# Altium PCB MCU.PcbDoc (part 1 of 3)
Units mm, origin at the board's own origin, x right, y up, seen from the top; angles counter-clockwise.
Board outline 98.27 x 98.24 mm, 2 copper layers (Top Layer, Bottom Layer); 274 components, 263 nets, 1117 pads, 8 vias.
Unrouted connection lines stored in the file: 819.
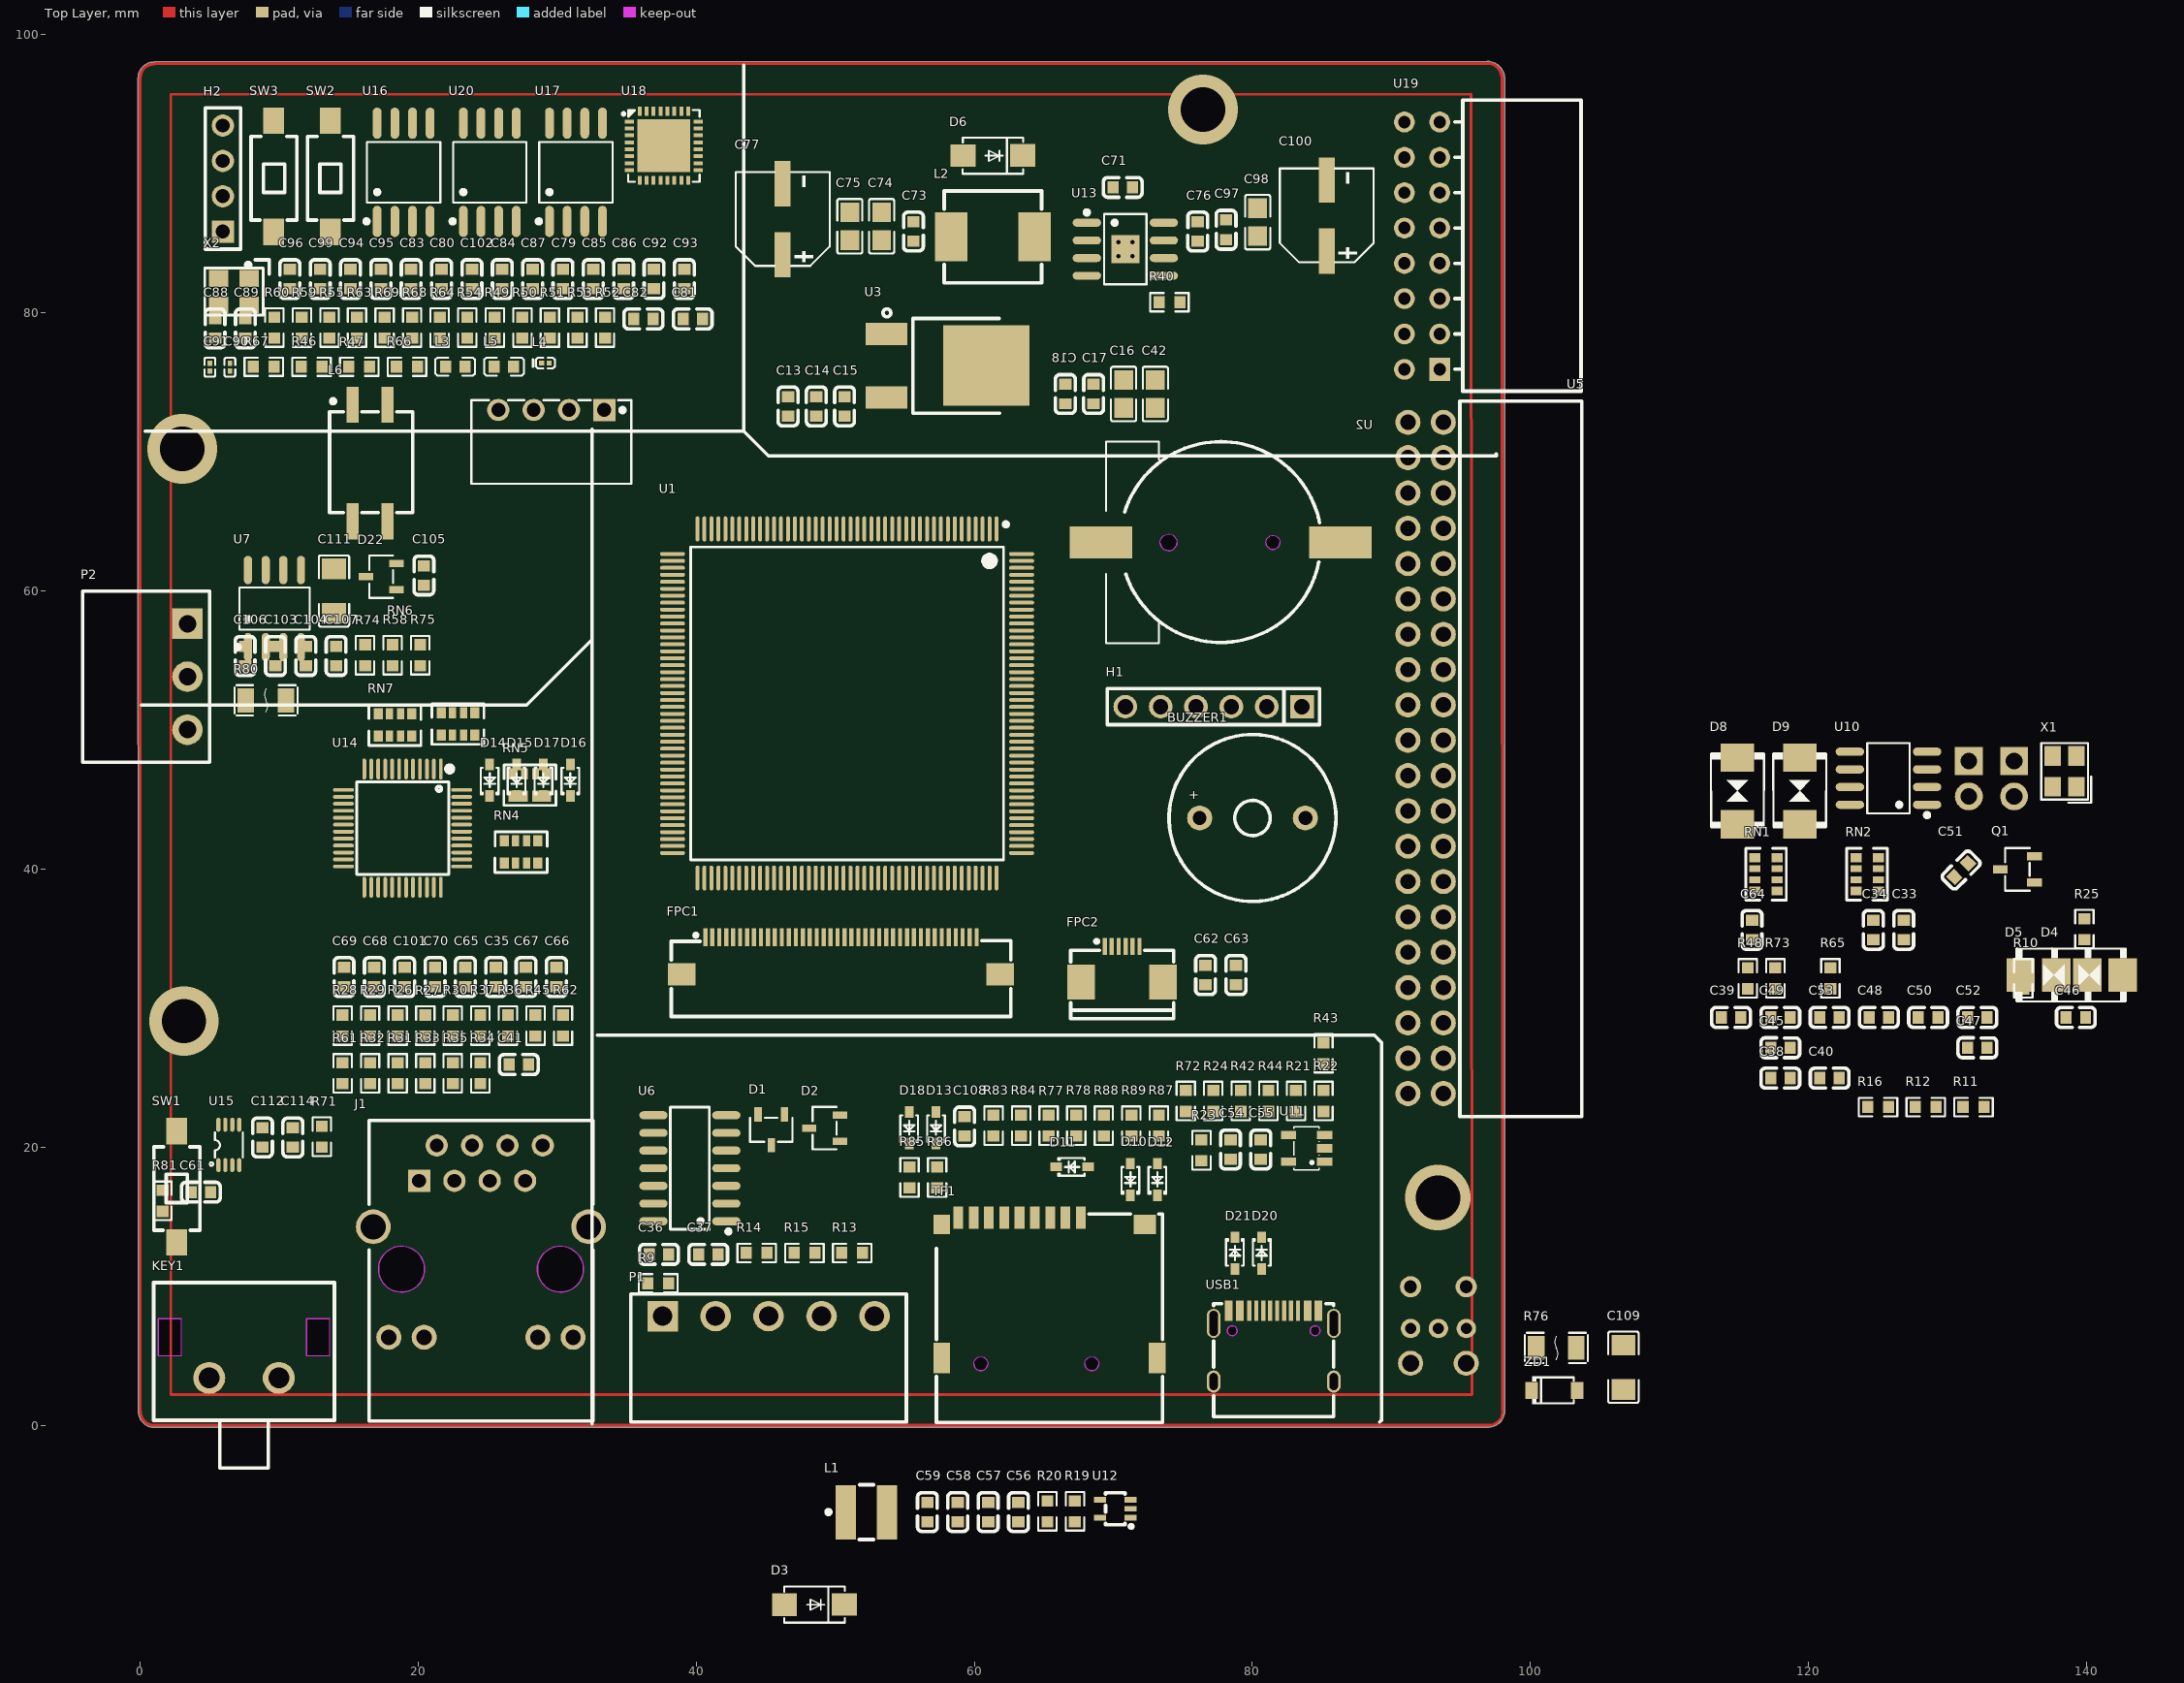
[diagram p0: Top Layer view]
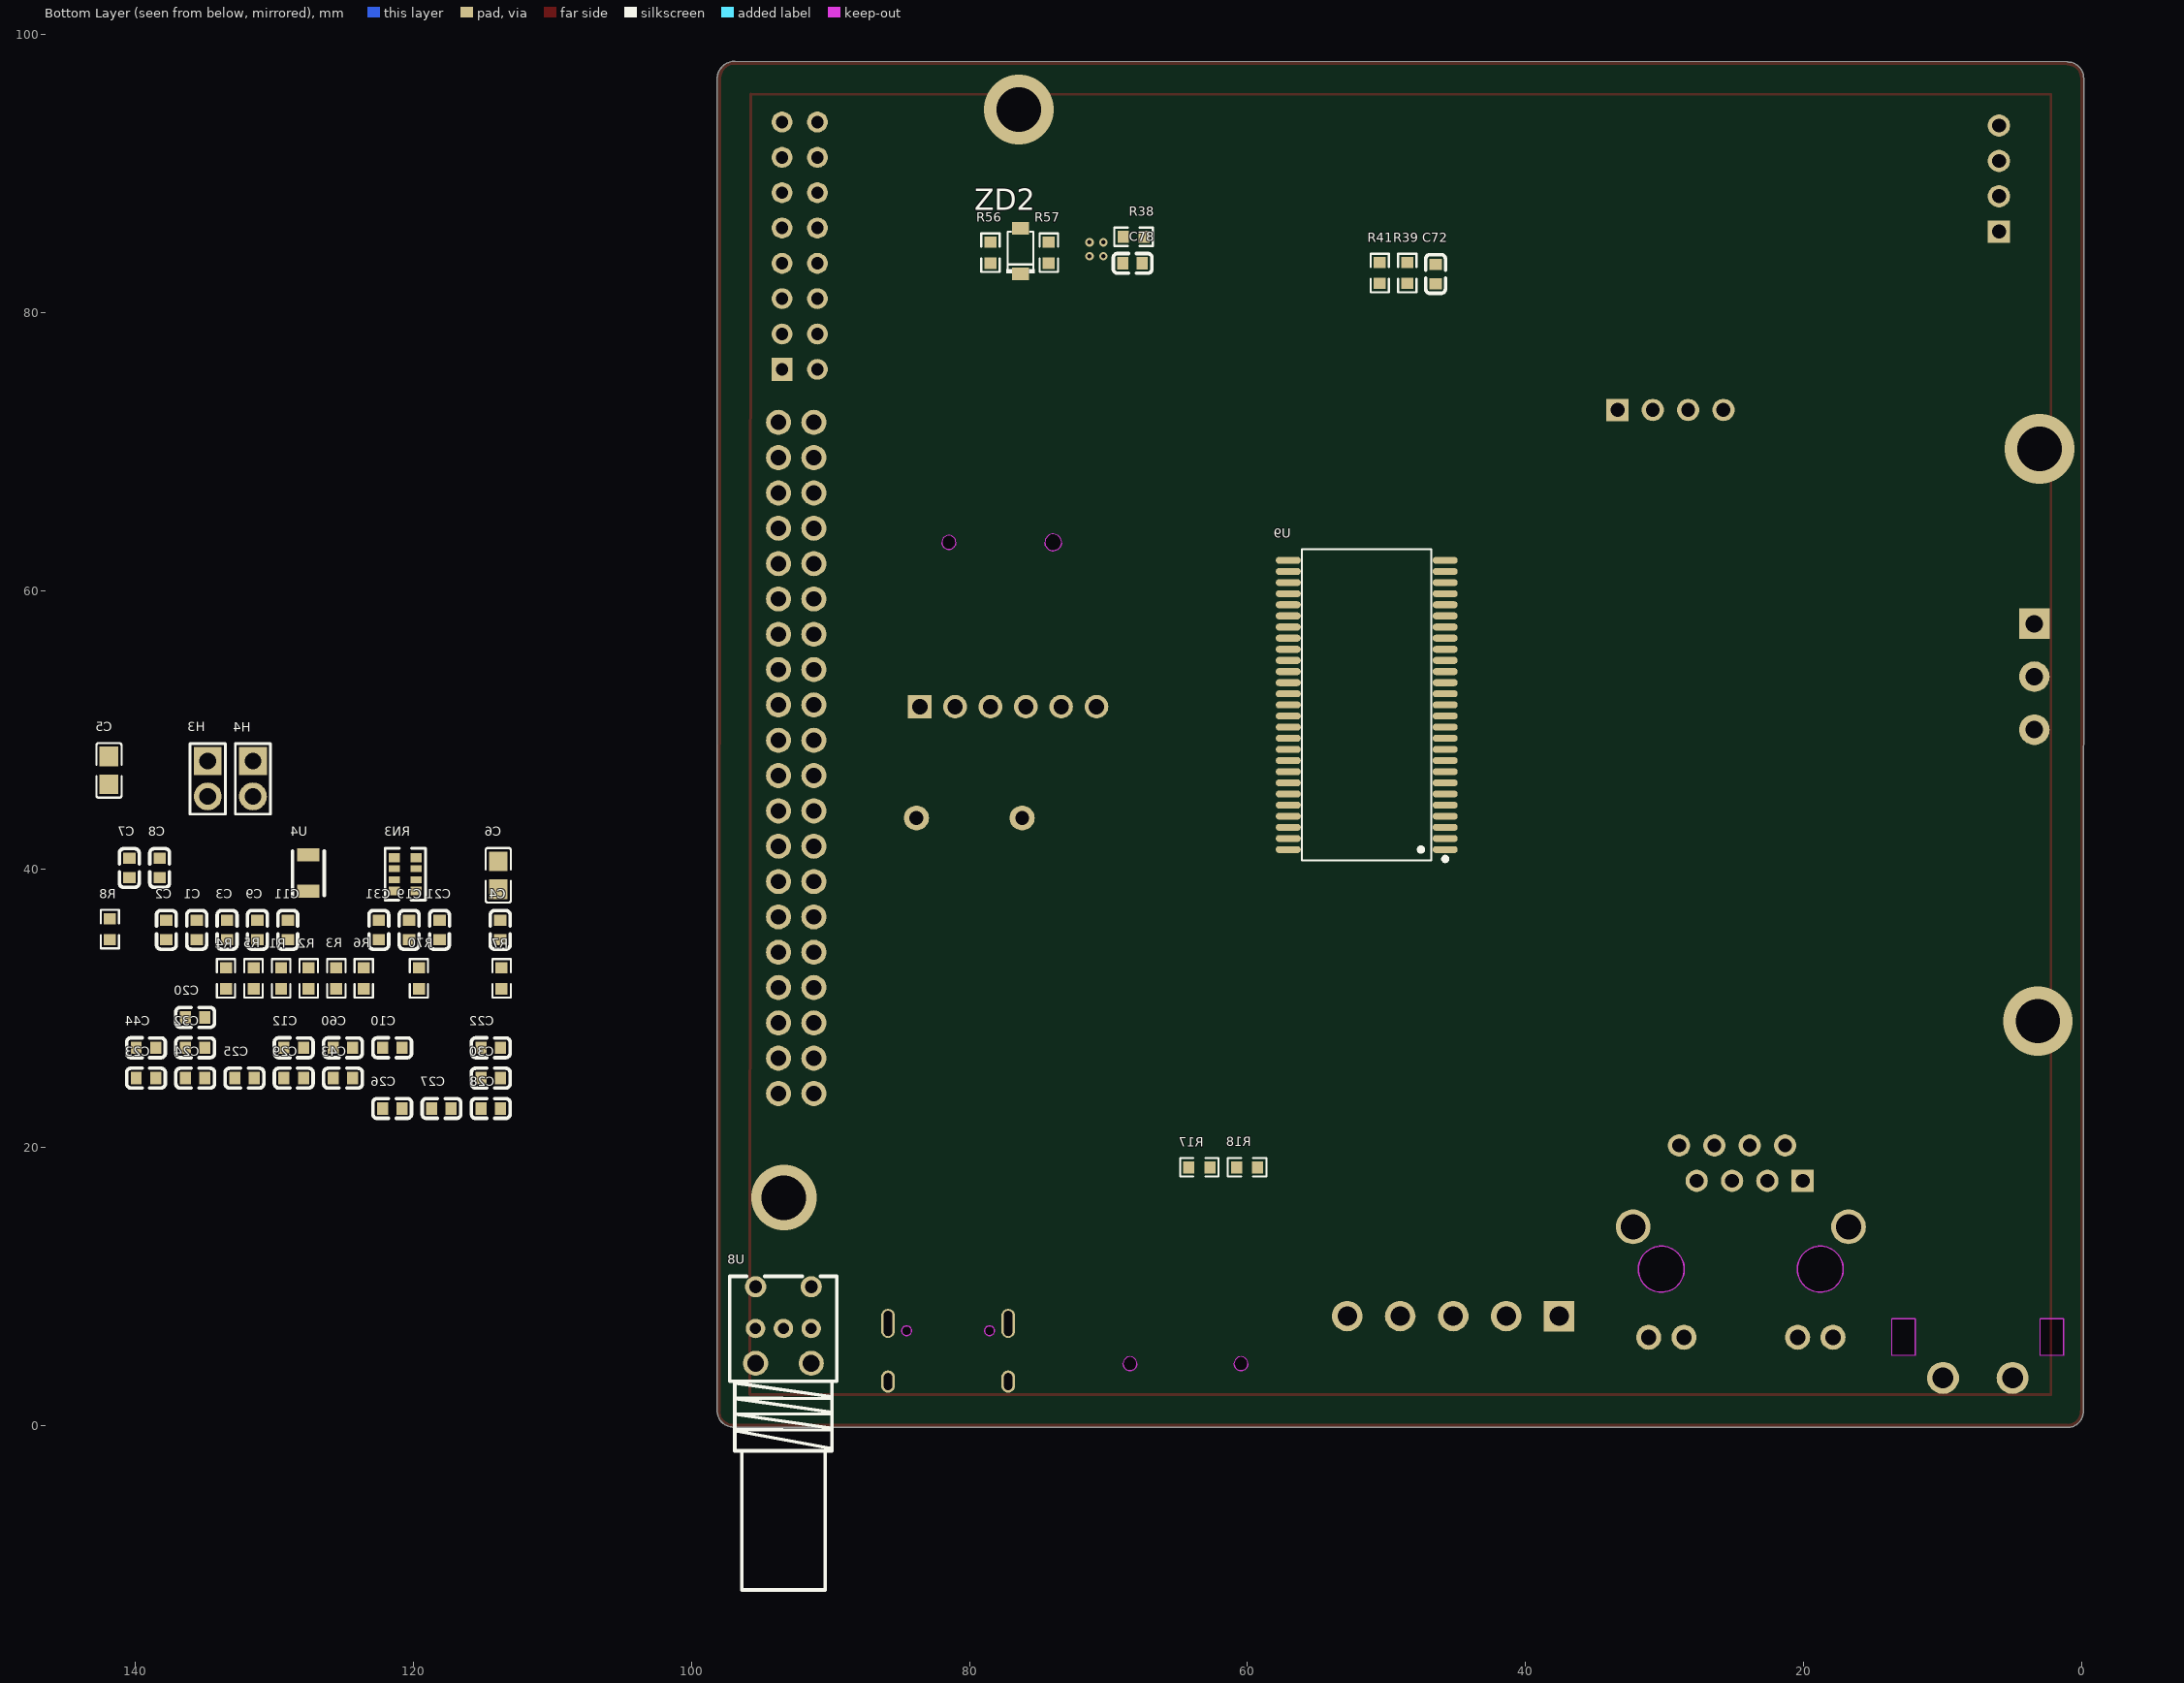
[diagram p1: Bottom Layer view, seen from below]

## Layer stack, top to bottom
Top Solder: solder mask 0.0102, Solder Resist, Dk 3.5
Top Layer: signal copper 0.0356
Dielectric 1: dielectric 0.32, FR-4, Dk 4.8
Bottom Layer: signal copper 0.0356
Bottom Solder: solder mask 0.0102, Solder Resist, Dk 3.5

## Board outline
-0.095,0.924 -0.127,96.901 -0.119,96.948 cw(c1.024,96.893) 0.954,98.035 1.037,98.066 96.858,98.1 cw(c96.858,96.816) 98.142,96.816 98.142,1.045 98.134,0.999 cw(c96.992,1.045) 97.116,-0.092 97.028,-0.127 1.088,-0.127 1.045,-0.135 cw(c1.045,1.008)

## Design rules (kind name [scope] priority, off if disabled: settings)
Clearance [All] p1: gap=0.254 ignorepadtopadclearanceinfootprint=FALSE
PolygonConnect [All] p1: connectstyle=Relief reliefconductorwidth=0.254 reliefentries=4 polygonreliefangle="90 Angle" airgapwidth=0.254
RoutingVias [All] p1: holewidth=0.711 width=1.27 viastyle="Through Hole" minholewidth=0.711 minwidth=1.27 maxholewidth=0.711 maxwidth=1.27
SolderMaskExpansion [All] p1: expansion=0.102 istentingtop=FALSE
SupplyNets "Schematic Supply Nets_6" [InNet('GND')] p1: voltage=0.000
SupplyNets "Schematic Supply Nets_3" [InNet('CAN_GND')] p2: voltage=0.000
SupplyNets "Schematic Supply Nets_1" [InNet('NetC54_1')] p3: voltage=0.000
SupplyNets "Schematic Supply Nets_10" [InNet('CAN_+5V')] p4: voltage=0.000
SupplyNets "Schematic Supply Nets_8" [InNet('+3V3')] p5: voltage=0.000
SupplyNets "Schematic Supply Nets_7" [InNet('PE')] p6: voltage=0.000
SupplyNets "Schematic Supply Nets_5" [InNet('+3V3（A）')] p7: voltage=0.000
SupplyNets "Schematic Supply Nets_4" [InNet('+12V')] p8: voltage=0.000
SupplyNets "Schematic Supply Nets_2" [InNet('+VBUS')] p9: voltage=0.000
SupplyNets "Schematic Supply Nets" [InNet('+5V')] p10: voltage=0.000
Width [All] p1: maxlimit=0.254 minlimit=0.254 preferedwidth=0.254
30 further rules are at their usual default settings.

## Classes and differential pairs
net class FMC_D[0..15]: FMC_D0 FMC_D1 FMC_D2 FMC_D3 FMC_D4 FMC_D5 FMC_D6 FMC_D7 FMC_D8 FMC_D9 FMC_D10 FMC_D11 FMC_D12 FMC_D13 FMC_D14 FMC_D15
net class FMC_A[0..11]: FMC_A0 FMC_A1 FMC_A2 FMC_A3 FMC_A4 FMC_A5 FMC_A6 FMC_A7 FMC_A8 FMC_A9 FMC_A10 FMC_A11
component class "USB,TFT LCD,touchscreen,audio amplifier": BUZZER1 C54 C55 C56 C57 C58 C59 C62 C63 C64 D3 D20 D21 FPC1 FPC2 L1 Q1 R19 R20 R21 R22 R23 R24 R25 R42 R43 R44 R72 R73 U11 U12 USB1 ZD1
component class "SDRAM，JTAG，I2C EEPROM，SD Card": C43 C44 C45 C46 C47 C48 C49 C50 C51 C52 C53 C108 D4 D5 D8 D9 D10 D11 D12 D13 D18 H1 R17 R18 R77 R78 R83 R84 R85 R86 R87 R88 R89 TF1 U9 U10
component class MCU_F7: C1 C2 C3 C4 C5 C6 C7 C8 C9 C10 C11 C12 C13 C14 C15 C16 C17 C18 C19 C20 C21 C22 C23 C24 C25 C26 C27 C28 C29 C30 C31 C32 C42 C60 C71 C72 C73 C74 C75 C76 C77 C78 C97 C98 C100 D6 H3 H4 L2 R1 R2 R3 R4 R5 R6 R7 R8 R38 R39 R40 R41 R48 R56 R57 R65 R70 RN1 RN2 RN3 U1 U2 U3 U4 U13 X1 ZD2
component class IO_Connectors: C33 C34 C36 C37 C38 C39 C40 C61 C112 C114 D1 D2 KEY1 P1 R9 R10 R11 R12 R13 R14 R15 R16 R71 R81 SW1 U5 U6 U8 U15 U19
component class "Ethernet PHY": C35 C41 C65 C66 C67 C68 C69 C70 C101 D14 D15 D16 D17 J1 R26 R27 R28 R29 R30 R31 R32 R33 R34 R35 R36 R37 R45 R61 R62 RN4 RN5 RN6 RN7 U14
component class bootload_wifi: C79 C80 C81 C82 C83 C84 C85 C86 C87 C88 C89 C90 C91 C92 C93 C94 C95 C96 C99 C102 H2 L3 L4 L5 R46 R47 R49 R50 R51 R52 R53 R54 R55 R59 R60 R63 R64 R66 R67 R68 R69 SW2 SW3 U16 U17 U18 U20 X2

## Components (designator, comment, footprint, x,y, rotation, side; value= is the part's Value field where it differs from the comment)
BUZZER1 "tmb12a05_c96093" BUZ-TH_BD12.0-P7.60-D0.6-FD 80.01,43.688 r0 top value=2.4kHz
C1 "0.1uF" C0603 135.562,35.642 r270 bottom value=104
C2 "1uF" C0603 137.744,35.642 r270 bottom value=104
C3 "0.1uF" C0603 133.379,35.642 r270 bottom value=104
C4 "0.1uF" C0603 113.74,35.642 r270 bottom value=104
C5 "2.2uF" C0805 141.874,47.109 r270 bottom value=104
C6 "2.2uF" C0805 113.883,39.569 r270 bottom value=104
C7 "0.1uF" C0603 140.408,40.092 r270 bottom value=104
C8 "1uF" C0603 138.226,40.092 r270 bottom value=104
C9 "12pF" C0603 131.197,35.642 r270 bottom value=104
C10 "12.5pF" C0603 121.504,27.167 r180 bottom value=104
C11 "12pF" C0603 129.015,35.642 r270 bottom value=104
C12 "12.5pF" C0603 128.588,27.167 r180 bottom value=104
C13 "10uF" C0603 46.609,73.279 r90 top value=104
C14 "1uF" C0603 48.641,73.279 r90 top value=104
C15 "0.1uF" C0603 50.673,73.279 r90 top value=104
C16 "47uF" C0805 70.739,74.168 r90 top value=104
C17 "1uF" C0603 68.58,74.168 r90 top value=104
C18 "0.1uF" C0603 66.548,74.168 r90 top value=104
C19 "1uF" C0603 120.286,35.641 r90 bottom value=104
C20 "0.1uF" C0603 135.672,29.349 r180 bottom value=104
C21 "0.1uF" C0603 118.104,35.642 r270 bottom value=104
C22 "0.1uF" C0603 114.42,27.167 r180 bottom value=104
C23 "0.1uF" C0603 139.214,24.985 r180 bottom value=104
C24 "0.1uF" C0603 135.672,24.985 r180 bottom value=104
C25 "0.1uF" C0603 132.13,24.985 r180 bottom value=104
C26 "1uF" C0603 121.504,22.802 r180 bottom value=104
C27 "0.1uF" C0603 117.962,22.802 r180 bottom value=104
C28 "0.1uF" C0603 114.42,22.802 r180 bottom value=104
C29 "0.1uF" C0603 128.588,24.985 r180 bottom value=104
C30 "0.1uF" C0603 114.42,24.985 r180 bottom value=104
C31 "0.1uF" C0603 122.469,35.642 r270 bottom value=104
C32 "0.1uF" C0603 135.672,27.167 r180 bottom value=104
C33 "1uF" C0603 126.833,35.641 r90 top value=104
C34 "2.2uF" C0603 124.651,35.641 r90 top value=104
C35 "0.1uF" C0603 25.591,32.251 r90 top value=104
C36 "1uF" C0603 37.331,12.311 r180 top value=104
C37 "0.1uF" C0603 40.873,12.311 r180 top value=104
C38 "10nF" C0603 117.962,24.985 r180 top value=104
C39 "10nF" C0603 114.42,29.349 r180 top value=104
C40 "10nF" C0603 121.504,24.985 r180 top value=104
C41 "0.1uF" C0603 27.25,25.959 r0 top value=104
C42 "22uF" C0805 73.025,74.168 r90 top value=104
C43 "1uF" C0603 125.046,24.985 r180 bottom value=104
C44 "0.1uF" C0603 139.214,27.167 r180 bottom value=104
C45 "1uF" C0603 117.962,27.167 r180 top value=104
C46 "0.1uF" C0603 139.214,29.349 r180 top value=104
C47 "1uF" C0603 132.13,27.167 r0 top value=104
C48 "0.1uF" C0603 125.046,29.349 r0 top value=104
C49 "0.1uF" C0603 117.962,29.349 r0 top value=104
C50 "0.1uF" C0603 128.588,29.349 r0 top value=104
C51 "0.1uF" C0603 130.967,39.944 r45 top value=104
C52 "0.1uF" C0603 132.13,29.349 r0 top value=104
C53 "0.1uF" C0603 121.504,29.349 r0 top value=104
C54 "2.2uF" C0603 78.421,19.852 r90 top value=104
C55 "0.1uF" C0603 80.604,19.852 r90 top value=104
C56 "4.7uF" C0603 63.18,-6.216 r90 top value=104
C57 "1uF" C0603 60.998,-6.216 r90 top value=104
C58 "4.7uF" C0603 58.815,-6.216 r90 top value=104
C59 "1uF" C0603 56.633,-6.216 r90 top value=104
C60 "2.2uF" C0603 125.046,27.167 r180 bottom value=104
C61 "1uF" C0603 4.388,16.783 r180 top value=104
C62 "0.1uF" C0603 76.635,32.392 r90 top value=104
C63 "1uF" C0603 78.817,32.392 r90 top value=104
C64 "0.1uF" C0603 115.922,35.641 r90 top value=104
C65 "0.1uF" C0603 23.409,32.252 r270 top value=104
C66 "10uF" C0603 29.955,32.252 r270 top value=104
C67 "0.1uF" C0603 27.773,32.252 r270 top value=104
C68 "0.1uF" C0603 16.862,32.252 r270 top value=104
C69 "0.1uF" C0603 14.68,32.252 r270 top value=104
C70 "0.1uF" C0603 21.226,32.252 r270 top value=104
C71 "0.1uF" C0603 70.674,89.027 r0 top value=104
C72 "220pF" C0603 46.482,82.804 r90 bottom value=104
C73 "0.1uF" C0603 55.626,85.852 r270 top value=104
C74 "4.7uF" C0805 53.34,86.233 r270 top value=104
C75 "22uF" C0805 51.054,86.233 r270 top value=104
C76 "0.1uF" C0603 76.073,85.852 r270 top value=104
C77 "100uf" CAP-SMD_BD6.3-L6.6-W6.6-RD 46.228,86.741 r270 top value=100uF
C78 "150pF" C0603 68.264,83.566 r180 bottom value=104
C79 "15pF" C0603 30.426,82.43 r90 top value=104
C80 "15pF" C0603 21.697,82.43 r90 top value=104
C81 "1uF" C0603 39.756,79.568 r0 top value=104
C82 "0.1uF" C0603 36.214,79.568 r180 top value=104
C83 "1uF" C0603 19.515,82.43 r90 top value=104
C84 "10uF" C0603 26.061,82.43 r90 top value=104
C85 "1uF" C0603 32.608,82.43 r90 top value=104
C86 "0.1uF" C0603 34.79,82.43 r90 top value=104
C87 "10uF" C0603 28.243,82.43 r90 top value=104
C88 "0.1uF" C0603 5.409,78.888 r90 top value=104
C89 "10uF" C0603 7.591,78.888 r90 top value=104
C90 "1pF" C0201 6.48,76.1 r90 top value=1uF
C91 "1pF" C0201 5.039,76.1 r90 top value=1uF
C92 "1uF" C0603 36.972,82.43 r90 top value=104
C93 "0.1uF" C0603 39.154,82.43 r90 top value=104
C94 "0.1uF" C0603 15.151,82.43 r90 top value=104
C95 "1uF" C0603 17.333,82.43 r90 top value=104
C96 "0.1uF" C0603 10.786,82.43 r90 top value=104
C97 "4.7uF" C0603 78.105,85.979 r270 top value=104
C98 "22uF" C0805 80.38,86.526 r270 top value=104
C99 "0.1uF" C0603 12.968,82.43 r90 top value=104
C100 "100uF" CAP-SMD_BD6.3-L6.6-W6.6-RD 85.344,86.995 r270 top
C101 "0.1uF" C0603 19.044,32.252 r270 top value=104
C102 "1uF" C0603 23.879,82.43 r90 top value=104
C103 "2.2uF" C0603 9.75,55.338 r90 top value=104
C104 "0.1uF" C0603 11.932,55.338 r90 top value=104
C105 "1uF" C0603 20.427,61.126 r90 top value=104
C106 "0.1uF" C0603 7.568,55.338 r90 top value=104
C107 "0.1uF" C0603 14.115,55.338 r90 top value=104
C108 "0.1uF" C0603 59.307,21.508 r90 top value=104
C109 "cc1206-1NF-2KV" C1206 106.68,4.191 r90 top value=1nF
C111 "cc1206-1NF-2KV" C1206 13.962,60.003 r90 top value=1nF
C112 "10nF" C0603 8.821,20.716 r90 top value=104
C114 "0.1uF" C0603 11.003,20.716 r90 top value=104
D1 "psm712-lf-t7" SOT-23-3_L3.0-W1.7-P0.95-LS2.9-BR 45.402,21.265 r90 top
D2 "psm712-lf-t7" SOT-23-3_L3.0-W1.7-P0.95-LS2.9-BR 49.234,21.385 r0 top
D3 "ss24" SMA_L4.3-W2.6-LS5.0-FD 48.509,-12.863 r0 top
D4 "SMBJ5.0CA" SMB_L4.6-W3.6-LS5.3-BI 140.184,32.404 r180 top
D5 "SMBJ5.0CA" SMB_L4.6-W3.6-LS5.3-BI 137.635,32.404 r180 top
D6 "ss34" SMA_L4.3-W2.6-LS5.0-FD 61.341,91.313 r0 top
D8 "SMBJ5.0CA" SMB_L4.6-W3.6-LS5.3-BI 114.884,45.633 r90 top
D9 "SMBJ5.0CA" SMB_L4.6-W3.6-LS5.3-BI 119.355,45.633 r90 top
D10 "esds311dyfr" SOD-323_L1.7-W1.3-LS2.6-RD-1 71.234,17.699 r90 top
D11 "esds311dyfr" SOD-323_L1.7-W1.3-LS2.6-RD-1 67.039,18.596 r0 top
D12 "esds311dyfr" SOD-323_L1.7-W1.3-LS2.6-RD-1 73.164,17.699 r90 top
D13 "esds311dyfr" SOD-323_L1.7-W1.3-LS2.6-RD-1 57.251,21.42 r90 top
D14 "esds311dyfr" SOD-323_L1.7-W1.3-LS2.6-RD-1 25.162,46.401 r90 top
D15 "esds311dyfr" SOD-323_L1.7-W1.3-LS2.6-RD-1 27.092,46.401 r90 top
D16 "esds311dyfr" SOD-323_L1.7-W1.3-LS2.6-RD-1 30.952,46.401 r90 top
D17 "esds311dyfr" SOD-323_L1.7-W1.3-LS2.6-RD-1 29.022,46.401 r90 top
D18 "esds311dyfr" SOD-323_L1.7-W1.3-LS2.6-RD-1 55.321,21.42 r90 top
D20 "esds311dyfr" SOD-323_L1.7-W1.3-LS2.6-RD-1 80.671,12.4 r270 top
D21 "esds311dyfr" SOD-323_L1.7-W1.3-LS2.6-RD-1 78.741,12.4 r270 top
D22 "psm712-lf-t7" SOT-23-3_L3.0-W1.7-P0.95-LS2.9-BR 17.36,61.041 r0 top
FPC1 "afc01-s40fca-00" FPC-SMD_AFC01-S40FCA-00 50.419,33.782 r0 top
FPC2 "fpc-05f-6ph20" FPC-SMD_6P-P0.50_XUNPU_FPC-05F-6PH20 70.631,33.165 r0 top
H1 "pz254v-11-06p" HDR-TH_6P-P2.54-V-M 77.216,51.689 r180 top
H2 "lail-pz2.54-4p-l" CONN-TH_LAIL-PZ2.54-4P-L 5.969,89.662 r90 top
H3 "pz254v-11-02p" HDR-TH_2P-P2.54-V-M 134.768,46.507 r270 bottom
H4 "pz254v-11-02p" HDR-TH_2P-P2.54-V-M 131.516,46.507 r270 bottom
J1 "hr911105a" RJ45-TH_HR911105A 24.532,13.245 r0 top
KEY1 "tl1100cf160q" KEY-TH_TL1100CF160Q 7.493,3.429 r0 top
L1 "3.3uH" IND-SMD_L3.9-W3.9-1 52.246,-6.223 r0 top
L2 "fxl0630-100-m" IND-SMD_L7.3-W6.8 61.341,85.471 r180 top value=10uH
L3 "2.2uH" L0603 22.678,76.137 r0 top value=10uH
L4 "1nL" L0201-RD 29.16,76.396 r0 top value=2nH
L5 "24nH" L0603 26.186,76.137 r0 top value=10uH
L6 "b82793s0513n201" FILTER-SMD_4P-L9.0-W6.0_B82790 16.565,69.206 r0 top
P1 "wj15edgrc-3.81-05p-14-00a" CONN-TH_5P-P3.81_WJ15EDGRC-3.81-5P 45.212,7.874 r0 top
P2 "wj500v-5.08-03p-14-00a" CONN-TH_3P-P3.81_WJ15EDGRC-3.81-3P 3.429,53.848 r270 top
Q1 "2n7002k-t1-ge3" SOT-23-3_L2.9-W1.6-P1.90-LS2.8-BR 135.01,39.996 r0 top
R1 "4.7K" R0603 129.493,32.155 r270 bottom
R2 "4.7K" R0603 127.511,32.155 r270 bottom
R3 "4.7K" R0603 125.529,32.155 r270 bottom
R4 "4.7K" R0603 133.456,32.155 r270 bottom
R5 "10K" R0603 131.474,32.155 r270 bottom
R6 "10K" R0603 123.548,32.155 r270 bottom
R7 "BLM18AG102SH1D" R0603 113.64,32.155 r270 bottom
R8 "47R" R0603 141.807,35.697 r270 bottom
R9 "1K" R0603 37.275,10.229 r0 top
R10 "4.7K" R0603 135.437,32.155 r90 top
R11 "4.7K" R0603 131.851,22.903 r0 top
R12 "10K" R0603 128.421,22.903 r180 top
R13 "4.7K" R0603 51.22,12.412 r180 top
R14 "1K" R0603 44.359,12.412 r180 top
R15 "4.7K" R0603 47.79,12.412 r180 top
R16 "10K" R0603 124.99,22.903 r180 top
R17 "10K" R0603 63.465,18.57 r180 bottom
R18 "10K" R0603 60.035,18.57 r180 bottom
R19 "10R" R0603 67.243,-6.16 r90 top
R20 "10R" R0603 65.262,-6.16 r90 top
R21 "5.1K" R0603 83.134,23.339 r90 top
R22 "5.1K" R0603 85.115,23.339 r90 top
R23 "22R" R0603 76.34,19.797 r90 top
R24 "22R" R0603 77.189,23.339 r90 top
R25 "10K" R0603 139.825,35.697 r90 top
R26 "2.2KΩ" R0603 18.543,28.765 r270 top
R27 "2.2KΩ" R0603 20.525,28.765 r270 top
R28 "2.2KΩ" R0603 14.58,28.765 r270 top
R29 "220Ω" R0603 16.561,28.765 r270 top
R30 "220Ω" R0603 22.506,28.765 r270 top
R31 "2.2KΩ" R0603 18.543,25.335 r270 top
R32 "2.2KΩ" R0603 16.561,25.335 r270 top
R33 "4K87Ω" R0603 20.525,25.335 r270 top
R34 "2.2KΩ" R0603 24.488,25.335 r270 top
R35 "BLM18AG102SH1D" R0603 22.506,25.335 r270 top
R36 "49.9Ω" R0603 26.469,28.765 r270 top
R37 "49.9Ω" R0603 24.488,28.765 r270 top
R38 "100k" R0603 68.199,85.471 r180 bottom
R39 "210k" R0603 48.512,82.868 r90 bottom
R40 "100k" R0603 74.041,80.772 r0 top
R41 "40.2k" R0603 50.494,82.868 r270 bottom
R42 "10K" R0603 79.17,23.339 r90 top
R43 "5.1K" R0603 85.115,26.769 r90 top
R44 "5.1K" R0603 81.152,23.339 r90 top
R45 "2.2KΩ" R0603 28.451,28.765 r270 top
R46 "100KΩ" R0603 12.347,76.126 r180 top
R47 "100KΩ" R0603 15.778,76.126 r180 top
R48 "4.7K" R0603 115.621,32.155 r90 top
R49 "499Ω" R0603 25.526,78.944 r90 top
R50 "100KΩ" R0603 27.508,78.944 r90 top
R51 "100KΩ" R0603 29.489,78.944 r90 top
R52 "0Ω" R0603 33.452,78.944 r90 top
R53 "0Ω" R0603 31.471,78.944 r90 top
R54 "0Ω" R0603 23.544,78.944 r90 top
R55 "0Ω" R0603 13.636,78.944 r90 top
R56 "20k" R0603 78.486,84.328 r270 bottom
R57 "10k" R0603 74.295,84.328 r270 bottom
R58 "5Ω" R0603 18.178,55.394 r90 top
R59 "100KΩ" R0603 11.655,78.944 r90 top
R60 "100KΩ" R0603 9.673,78.944 r90 top
R61 "49.9Ω" R0603 14.58,25.335 r270 top
R62 "49.9Ω" R0603 30.433,28.765 r270 top
R63 "10kΩ" R0603 15.618,78.944 r90 top
R64 "10kΩ" R0603 21.563,78.944 r90 top
R65 "4.7K" R0603 121.566,32.155 r90 top
R66 "10KΩ" R0603 19.208,76.126 r180 top
R67 "10KΩ" R0603 8.916,76.126 r180 top
R68 "10KΩ" R0603 19.581,78.944 r90 top
R69 "10KΩ" R0603 17.6,78.944 r90 top
R70 "0R" R0603 119.585,32.155 r270 bottom
R71 "1K" R0603 13.085,20.772 r90 top
R72 "10K" R0603 75.207,23.339 r90 top
R73 "100K" R0603 117.603,32.155 r90 top
R74 "5Ω" R0603 16.196,55.394 r90 top
R75 "120Ω" R0603 20.16,55.394 r90 top
R76 "1206-1M" F1206 101.854,5.588 r0 top
R77 "10K" R0603 65.352,21.564 r90 top
R78 "10K" R0603 67.334,21.564 r90 top
R80 "1206-1M" F1206 9.076,52.145 r0 top
R81 "10K" R0603 1.626,16.159 r90 top
R83 "10R" R0603 61.389,21.564 r90 top
R84 "10R" R0603 63.371,21.564 r90 top
R85 "10R" R0603 55.347,17.846 r90 top
R86 "10R" R0603 57.328,17.846 r90 top
R87 "10R" R0603 73.279,21.564 r90 top
R88 "10R" R0603 69.315,21.564 r90 top
R89 "10R" R0603 71.297,21.564 r90 top
RN1 "4d03wgj0330t5e" RES-ARRAY-SMD_0603-8P-L3.2-W1.6-BL 116.942,39.636 r90 top value=33Ω
RN2 "4d03wgj0330t5e" RES-ARRAY-SMD_0603-8P-L3.2-W1.6-BL 124.201,39.636 r90 top value=33Ω
RN3 "4d03wgj0330t5e" RES-ARRAY-SMD_0603-8P-L3.2-W1.6-BL 120.571,39.639 r270 bottom value=33Ω
RN4 "4d03wgj0330t5e" RES-ARRAY-SMD_0603-8P-L3.2-W1.6-BL 27.414,41.237 r180 top value=33Ω
RN5 "4d03wgj0330t5e" RES-ARRAY-SMD_0603-8P-L3.2-W1.6-BL 28.049,46.063 r180 top value=33Ω
RN6 "4d03wgj0330t5e" RES-ARRAY-SMD_0603-8P-L3.2-W1.6-BL 22.88,50.457 r180 top value=33Ω
RN7 "4d03wgj0330t5e" RES-ARRAY-SMD_0603-8P-L3.2-W1.6-BL 18.346,50.381 r180 top value=33Ω
SW1 "TS-1101-C-W" SW-SMD_L6.0-W3.3-LS8.0 2.648,17.181 r90 top
SW2 "TS-1101-C-W" SW-SMD_L6.0-W3.3-LS8.0 13.695,89.817 r90 top
SW3 "TS-1101-C-W" SW-SMD_L6.0-W3.3-LS8.0 9.633,89.817 r90 top
TF1 "tf-card h1.8" TF-SMD_TF-CARD-H1.8 65.405,9.906 r0 top
U1 "stm32f769iit6" LQFP-176_L24.0-W24.0-P0.50-LS26.0-BL 50.853,51.92 r180 top
U2 "kh-cr1220-2" BAT-SMD_CR1220-2 77.724,63.5 r0 top
U3 "uz1085l-33-tn3-r" TO-252-2_L6.6-W6.1-P4.58-TL 57.277,76.2 r0 top
U4 "fc31m2-32.768-ntlnndtl" CRYSTAL-SMD_L3.2-W1.5 127.527,39.724 r270 bottom value=32.768kHz
U5 "ds1024-2x20r2" HDR-TH_40P-P2.54-H-F-R2-C20-S2.54-W8.5 92.456,48.006 r270 top
U6 "74hc125d" SOIC-14_L8.7-W3.9-P1.27-LS6.0-BL 39.553,18.505 r90 top
U7 "ca-is1044s" SOIC-8_L4.9-W3.9-P1.27-LS6.0-BL 9.683,58.747 r0 top
U8 "ed08905m-fe15c7.0-c10-2053" SW-TH_CTR_ED08905M-FE15C7.0-C10-2053 93.375,7.234 r180 bottom
U9 "is42s16400j-7tli-tr" TSOP-54_L22.2-W10.2-P0.80-LS11.8-BL 51.435,51.816 r90 bottom
U10 "at24c256c-sshl-b" SOIC-8_L4.9-W3.9-P1.27-LS6.0-BL 125.74,46.547 r90 top
U11 "tps2051bdbvr" SOT-23-5_L3.0-W1.7-P0.95-LS2.8-BR 83.9,19.936 r0 top
U12 "tps61169dckr" SC-70-5_L2.1-W1.3-P0.65-LS2.1-BR 70.139,-5.977 r0 top
U13 "mp1584en-lf-z" SOIC-8_L5.0-W4.0-P1.27-LS6.0-BL-EP2.0 70.866,84.582 r270 top
U14 "dp83848cvv" LQFP-48_L7.0-W7.0-P0.50-LS9.0-BL 18.893,42.956 r180 top
U15 "74aup1g74dc" SOT765-1_L2.0-W2.3-P0.50-LS3.1-BL 6.4,20.181 r0 top
U16 "w25q32jvssiq" SOIC-8_L5.3-W5.3-P1.27-LS8.0-BL 18.97,90.112 r0 top
U17 "w25q32jvssiq" SOIC-8_L5.3-W5.3-P1.27-LS8.0-BL 31.361,90.112 r0 top
U18 "esp32-c3" QFN-32_L5.0-W5.0-P0.50-TL-EP3.7 37.684,92.016 r0 top
U19 "b254w11-0b16p51-h85c32" HDR-TH_16P-P2.54-H-F-R2-C8-W8.5 92.202,84.836 r90 top
U20 "w25q32jvssiq" SOIC-8_L5.3-W5.3-P1.27-LS8.0-BL 25.166,90.112 r0 top
USB1 "TYPEC-304-BCP16" USB-C-SMD_TYPEC-304-BCP16 81.534,5.715 r0 top
X1 "x322525mob4si" CRYSTAL-SMD_4P-L3.2-W2.5-BL 138.402,47.046 r90 top value=25MHz
X2 "x322540mpb4si" OSC-SMD_4P-L3.2-W2.5-BL_SIT8008BI 6.774,81.534 r180 top value=40MHz
ZD1 "BZD52C6.2V" SOD-123_L2.7-W1.6-LS3.7-RD 101.727,2.54 r0 top
ZD2 "BZD52C3.3V" SOD-123_L2.7-W1.6-LS3.7-RD 76.327,84.455 r90 bottom
? "b0505s" PWRM-TH_B0505S-1WR3 29.591,73.025 r180 top value=200kHz~340kHz

## Footprints (in the part's own frame and the unit in brackets; to place one, negate y for a bottom-side part, rotate by r counter-clockwise, add the part's x,y. Pads: shape width x height; smd on the part's side, far side on the other; paste and mask are expansions set on the pad)
BAT-SMD_CR1220-2 [mil]
  rect 177.2x90.6 smd: 1(-338.6,0) 2(338.5,0)
  Keep-Out Layer board cut-out: -124.1,0 -124.4,-4.2 -125.6,-8.3 -127.4,-12.1 -129.9,-15.5 -132.9,-18.4 -136.5,-20.8 -140.4,-22.4 -144.5,-23.4 -148.7,-23.6 -152.9,-23 -157,-21.7 -160.7,-19.7 -164,-17.1 -166.8,-13.9 -169,-10.2 -170.4,-6.3 -171.2,-2.1 -171.2,2.1 -170.4,6.3 -169,10.3 -166.8,13.9 -164,17.1 -160.7,19.7 -157,21.7 -152.9,23.1 -148.7,23.6 -144.5,23.4 -140.4,22.5 -136.5,20.8 -132.9,18.5 -129.9,15.6 -127.4,12.1 -125.6,8.3 -124.4,4.2 -124.1,0
  Keep-Out Layer board cut-out: 167.3,0 166.9,-3.8 165.8,-7.5 164,-10.9 161.5,-13.9 158.5,-16.3 155.1,-18.2 151.4,-19.3 147.6,-19.7 143.8,-19.3 140.1,-18.2 136.7,-16.3 133.7,-13.9 131.2,-10.9 129.4,-7.5 128.3,-3.8 127.9,0 128.3,3.9 129.4,7.6 131.2,11 133.7,13.9 136.7,16.4 140.1,18.2 143.8,19.3 147.6,19.7 151.4,19.3 155.1,18.2 158.5,16.4 161.5,13.9 164,11 165.8,7.6 166.9,3.9 167.3,0
  Keep-Out Layer region: -124.1,0 -124.4,-4.2 -125.6,-8.3 -127.4,-12.1 -129.9,-15.5 -132.9,-18.4 -136.5,-20.8 -140.4,-22.4 -144.5,-23.4 -148.7,-23.6 -152.9,-23 -157,-21.7 -160.7,-19.7 -164,-17.1 -166.8,-13.9 -169,-10.2 -170.4,-6.3 -171.2,-2.1 -171.2,2.1 -170.4,6.3 -169,10.3 -166.8,13.9 -164,17.1 -160.7,19.7 -157,21.7 -152.9,23.1 -148.7,23.6 -144.5,23.4 -140.4,22.5 -136.5,20.8 -132.9,18.5 -129.9,15.6 -127.4,12.1 -125.6,8.3 -124.4,4.2 -124.1,0
  Keep-Out Layer region: -124.1,0 -124.4,-4.2 -125.6,-8.3 -127.4,-12.1 -129.9,-15.5 -132.9,-18.4 -136.5,-20.8 -140.4,-22.4 -144.5,-23.4 -148.7,-23.6 -152.9,-23 -157,-21.7 -160.7,-19.7 -164,-17.1 -166.8,-13.9 -169,-10.2 -170.4,-6.3 -171.2,-2.1 -171.2,2.1 -170.4,6.3 -169,10.3 -166.8,13.9 -164,17.1 -160.7,19.7 -157,21.7 -152.9,23.1 -148.7,23.6 -144.5,23.4 -140.4,22.5 -136.5,20.8 -132.9,18.5 -129.9,15.6 -127.4,12.1 -125.6,8.3 -124.4,4.2 -124.1,0
  Keep-Out Layer region: 167.3,0 166.9,-3.8 165.8,-7.5 164,-10.9 161.5,-13.9 158.5,-16.3 155.1,-18.2 151.4,-19.3 147.6,-19.7 143.8,-19.3 140.1,-18.2 136.7,-16.3 133.7,-13.9 131.2,-10.9 129.4,-7.5 128.3,-3.8 127.9,0 128.3,3.9 129.4,7.6 131.2,11 133.7,13.9 136.7,16.4 140.1,18.2 143.8,19.3 147.6,19.7 151.4,19.3 155.1,18.2 158.5,16.4 161.5,13.9 164,11 165.8,7.6 166.9,3.9 167.3,0
  Keep-Out Layer region: 167.3,0 166.9,-3.8 165.8,-7.5 164,-10.9 161.5,-13.9 158.5,-16.3 155.1,-18.2 151.4,-19.3 147.6,-19.7 143.8,-19.3 140.1,-18.2 136.7,-16.3 133.7,-13.9 131.2,-10.9 129.4,-7.5 128.3,-3.8 127.9,0 128.3,3.9 129.4,7.6 131.2,11 133.7,13.9 136.7,16.4 140.1,18.2 143.8,19.3 147.6,19.7 151.4,19.3 155.1,18.2 158.5,16.4 161.5,13.9 164,11 165.8,7.6 166.9,3.9 167.3,0
  Keep-Out Layer lines w0.1: -171.2,-2.1 -170.4,-6.3 -169,-10.2 -166.8,-13.9 -164,-17.1 -160.7,-19.7 -157,-21.7 -152.9,-23 -148.7,-23.6 -144.5,-23.4 -140.4,-22.4 -136.5,-20.8 -132.9,-18.4 -129.9,-15.5 -127.4,-12.1 -125.6,-8.3 -124.4,-4.2 -124.1,0 -124.4,4.2 -125.6,8.3 -127.4,12.1 -129.9,15.6 -132.9,18.5 -136.5,20.8 -140.4,22.5 -144.5,23.4 -148.7,23.6 -152.9,23.1 -157,21.7 -160.7,19.7 -164,17.1 -166.8,13.9 -169,10.3 -170.4,6.3 -171.2,2.1 -171.2,-2.1 ; 127.9,0 128.3,-3.8 129.4,-7.5 131.2,-10.9 133.7,-13.9 136.7,-16.3 140.1,-18.2 143.8,-19.3 147.6,-19.7 151.4,-19.3 155.1,-18.2 158.5,-16.3 161.5,-13.9 164,-10.9 165.8,-7.5 166.9,-3.8 167.3,0 166.9,3.9 165.8,7.6 164,11 161.5,13.9 158.5,16.4 155.1,18.2 151.4,19.3 147.6,19.7 143.8,19.3 140.1,18.2 136.7,16.4 133.7,13.9 131.2,11 129.4,7.6 128.3,3.9 127.9,0
  silkscreen extent -325,-285 280,285
BUZ-TH_BD12.0-P7.60-D0.6-FD [mm]
  round 1.8 hole 1: 1(-3.8,0) 2(3.8,0)
  silkscreen extent -6,-6 6,6
C0201 [mm]
  rect 0.368x0.324 smd paste-100 mask+0.051: 1(-0.274,0) 2(0.274,0)
  silkscreen extent -0.69,-0.39 0.69,0.39
C0603 [mm]
  rect 0.8x0.9 smd paste+0 mask+0.102: 1(-0.7,0) 2(0.7,0)
  silkscreen extent -1.39,-0.71 1.39,0.71
C0805 [mm]
  rect 1.41x1.35 smd paste-100 mask+0.051: 1(-1,0) 2(1,0)
  silkscreen extent -1.96,-0.9 1.96,0.9
C1206 [mm]
  rect 1.485x1.728 smd paste-100 mask+0.051: 1(-1.593,0) 2(1.593,0)
  silkscreen extent -2.56,-1.09 2.56,1.09
CAP-SMD_BD6.3-L6.6-W6.6-RD [mm]
  rect 3.26x1.15 smd: 1(2.555,0) 2(-2.555,0)
  silkscreen extent -3.39,-3.38 3.36,3.38
CONN-TH_3P-P3.81_WJ15EDGRC-3.81-3P [mm]
  rect 2.2x2.2 hole 1.26: 1(-3.81,0)
  round 2.2 hole 1.26: 2(0,0) 3(3.81,0)
  silkscreen extent -6.15,-7.55 6.15,1.6
CONN-TH_5P-P3.81_WJ15EDGRC-3.81-5P [mm]
  rect 2.2x2.2 hole 1.4: 1(-7.62,0)
  round 2.2 hole 1.4: 2(-3.81,0) 3(0,0) 4(3.81,0) 5(7.62,0)
  silkscreen extent -9.91,-7.62 9.91,1.6
CONN-TH_LAIL-PZ2.54-4P-L [mm]
  rect 1.6x1.6 hole 1 paste-2539.97 mask+0.051: 1(-3.81,0)
  round 1.6 hole 1 paste-2539.97 mask+0.051: 2(-1.27,0) 3(1.27,0) 4(3.81,0)
  silkscreen extent -5.08,-1.27 5.08,1.27
CRYSTAL-SMD_4P-L3.2-W2.5-BL [mil]
  rect 55.1x47.2 smd: 1(-43.3,-33.5) 2(43.3,-33.5) 3(43.3,33.4) 4(-43.3,33.4)
  silkscreen extent -89,-75 80,66
CRYSTAL-SMD_L3.2-W1.5 [mil]
  rect 37.4x63 smd: 1(-51.5,0) 2(51.5,0)
  silkscreen extent -63,-45 63,45
F1206 [mm]
  rect 1.19x1.728 smd: 1(-1.445,0) 2(1.445,0)
  silkscreen extent -2.27,-1.09 2.27,1.09
FILTER-SMD_4P-L9.0-W6.0_B82790 [mm]
  rect 0.875x2.6 smd: 1(-1.25,4.195) 2(-1.25,-4.195) 3(1.25,-4.195) 4(1.25,4.195)
  silkscreen extent -2.92,-3.56 3.05,4.59
FPC-SMD_6P-P0.50_XUNPU_FPC-05F-6PH20 [mm]
  rect 0.3x1.25 smd paste+0 mask+0.05: 1(-1.25,1.288) 2(-0.75,1.288) 3(-0.25,1.288) 4(0.25,1.288) 5(0.75,1.288) 6(1.25,1.288)
  rect 2x2.5 smd paste+0 mask+0.05: 7(2.94,-1.288) 8(-2.94,-1.288)
  silkscreen extent -3.7,-3.91 3.7,1.78
FPC-SMD_AFC01-S40FCA-00 [mil]
  rect 11.8x51.2 smd: 1(-383.9,52.7) 2(-364.2,52.7) 3(-344.5,52.7) 4(-324.9,52.7) 5(-305.2,52.7) 6(-285.5,52.7) 7(-265.8,52.7) 8(-246.1,52.7) 9(-226.4,52.7) 10(-206.7,52.7) 11(-187.1,52.7) 12(-167.4,52.7) 13(-147.7,52.7) 14(-128,52.7) 15(-108.3,52.7) 16(-88.6,52.7) 17(-68.9,52.7) 18(-49.3,52.7) 19(-29.6,52.7) 20(-9.9,52.7) 21(9.8,52.7) 22(29.5,52.7) 23(49.2,52.7) 24(68.8,52.7) 25(88.5,52.7) 26(108.2,52.7) 27(127.9,52.7) 28(147.6,52.7) 29(167.3,52.7) 30(187,52.7) 31(206.6,52.7) 32(226.3,52.7) 33(246,52.7) 34(265.7,52.7) 35(285.4,52.7) 36(305.1,52.7) 37(324.8,52.7) 38(344.4,52.7) 39(364.1,52.7) 40(383.8,52.7)
  rect 78.7x63 smd: 41(-450.8,-52.8) 42(450.7,-52.8)
  silkscreen extent -481,-172 481,63
HDR-TH_2P-P2.54-V-M [mm]
  rect 2x2 hole 1.2 paste-2539.97: 1(-1.27,0)
  round 2 hole 1.2 paste-2539.97: 2(1.27,0)
  silkscreen extent -2.54,-1.27 2.54,1.27
HDR-TH_6P-P2.54-V-M [mm]
  rect 1.699x1.699 hole 1.1: 1(-6.35,0)
  round 1.699 hole 1.1: 2(-3.81,0) 3(-1.27,0) 4(1.27,0) 5(3.81,0) 6(6.35,0)
  silkscreen extent -7.6,-1.3 7.65,1.3
HDR-TH_16P-P2.54-H-F-R2-C8-W8.5 [mm]
  rect 1.7x1.5 hole 0.9 paste-2539.97 mask+0.05: 1(-8.89,-1.27)
  round 1.5 hole 0.9 paste-2539.97 mask+0.05: 2(-8.89,1.27) 3(-6.35,-1.27) 4(-6.35,1.27) 5(-3.81,-1.27) 6(-3.81,1.27) 7(-1.27,-1.27) 8(-1.27,1.27) 9(1.27,-1.27) 10(1.27,1.27) 11(3.81,-1.27) 12(3.81,1.27) 13(6.35,-1.27) 14(6.35,1.27) 15(8.89,-1.27) 16(8.89,1.27)
  silkscreen extent -10.46,-11.43 10.46,-2.35
HDR-TH_40P-P2.54-H-F-R2-C20-S2.54-W8.5 [mm]
  round 1.801 hole 1.1 paste-2539.97 mask+0.051: 1(-24.13,1.27) 2(-21.59,1.27) 3(-19.05,1.27) 4(-16.51,1.27) 5(-13.97,1.27) 6(-11.43,1.27) 7(-8.89,1.27) 8(-6.35,1.27) 9(-3.81,1.27) 10(-1.27,1.27) 11(1.27,1.27) 12(3.81,1.27) 13(6.35,1.27) 14(8.89,1.27) 15(11.43,1.27) 16(13.97,1.27) 17(16.51,1.27) 18(19.05,1.27) 19(21.59,1.27) 20(24.13,1.27) 21(24.13,-1.27) 22(21.59,-1.27) 23(19.05,-1.27) 24(16.51,-1.27) 25(13.97,-1.27) 26(11.43,-1.27) 27(8.89,-1.27) 28(6.35,-1.27) 29(3.81,-1.27) 30(1.27,-1.27) 31(-1.27,-1.27) 32(-3.81,-1.27) 33(-6.35,-1.27) 34(-8.89,-1.27) 35(-11.43,-1.27) 36(-13.97,-1.27) 37(-16.51,-1.27) 38(-19.05,-1.27) 39(-21.59,-1.27) 40(-24.13,-1.27)
  silkscreen extent -25.65,2.47 25.78,11.23
IND-SMD_L3.9-W3.9-1 [mm]
  rect 1.45x3.9 smd: 1(-1.475,0) 2(1.475,0)
  silkscreen extent -2.88,-1.97 0.52,1.97
IND-SMD_L7.3-W6.8 [mil]
  rect 92.5x137.8 smd: 1(-118.1,0) 2(118.1,0)
  silkscreen extent -138,-130 138,130
KEY-TH_TL1100CF160Q [mm]
  round 2.3 hole 1.5: 1(-2.5,0) 2(2.5,0)
  Keep-Out Layer board cut-out: 4.5,4.25 4.5,1.596 6.154,1.596 6.154,4.25 4.5,4.25
  Keep-Out Layer board cut-out: -6.157,4.257 -6.157,1.603 -4.503,1.603 -4.503,4.257 -6.157,4.257
  Keep-Out Layer region: 4.5,4.25 4.5,1.596 6.154,1.596 6.154,4.25 4.5,4.25
  Keep-Out Layer region: 4.5,4.25 4.5,1.596 6.154,1.596 6.154,4.25 4.5,4.25
  Keep-Out Layer region: -6.157,4.257 -6.157,1.603 -4.503,1.603 -4.503,4.257 -6.157,4.257
  Keep-Out Layer region: -6.157,4.257 -6.157,1.603 -4.503,1.603 -4.503,4.257 -6.157,4.257
  Keep-Out Layer lines w0.003: -6.157,1.603 -4.503,1.603 -4.503,4.257 -6.157,4.257 -6.157,1.603 ; 4.5,1.596 6.154,1.596 6.154,4.25 4.5,4.25 4.5,1.596
  silkscreen extent -6.5,-6.48 6.5,6.85
L0201-RD [mm]
  rect 0.368x0.324 smd paste-100 mask+0.051: 1(-0.274,0) 2(0.274,0)
  silkscreen extent -0.89,-0.39 0.69,0.39
L0603 [mm]
  rect 0.8x0.864 smd paste-100 mask+0.051: 1(-0.7,0) 2(0.7,0)
  silkscreen extent -1.42,-0.65 1.42,0.65
LQFP-48_L7.0-W7.0-P0.50-LS9.0-BL [mm]
  oval 0.27x1.5 smd paste+0 mask+0.05: 1(-2.75,-4.25) 2(-2.25,-4.25) 3(-1.75,-4.25) 4(-1.25,-4.25) 5(-0.75,-4.25) 6(-0.25,-4.25) 7(0.25,-4.25) 8(0.75,-4.25) 9(1.25,-4.25) 10(1.75,-4.25) 11(2.25,-4.25) 12(2.75,-4.25) 25(2.75,4.25) 26(2.25,4.25) 27(1.75,4.25) 28(1.25,4.25) 29(0.75,4.25) 30(0.25,4.25) 31(-0.25,4.25) 32(-0.75,4.25) 33(-1.25,4.25) 34(-1.75,4.25) 35(-2.25,4.25) 36(-2.75,4.25)
  oval 1.5x0.27 smd paste+0 mask+0.05: 13(4.25,-2.75) 14(4.25,-2.25) 15(4.25,-1.75) 16(4.25,-1.25) 17(4.25,-0.75) 18(4.25,-0.25) 19(4.25,0.25) 20(4.25,0.75) 21(4.25,1.25) 22(4.25,1.75) 23(4.25,2.25) 24(4.25,2.75) 37(-4.25,2.75) 38(-4.25,2.25) 39(-4.25,1.75) 40(-4.25,1.25) 41(-4.25,0.75) 42(-4.25,0.25) 43(-4.25,-0.25) 44(-4.25,-0.75) 45(-4.25,-1.25) 46(-4.25,-1.75) 47(-4.25,-2.25) 48(-4.25,-2.75)
  silkscreen extent -3.59,-4.46 3.3,3.34
LQFP-176_L24.0-W24.0-P0.50-LS26.0-BL [mil]
  oval 11x70.9 smd: 1(-423.2,-494.1) 2(-403.5,-494.1) 3(-383.8,-494.1) 4(-364.1,-494.1) 5(-344.5,-494.1) 6(-324.8,-494.1) 7(-305.1,-494.1) 8(-285.4,-494.1) 9(-265.7,-494.1) 10(-246,-494.1) 11(-226.4,-494.1) 12(-206.7,-494.1) 13(-187,-494.1) 14(-167.3,-494.1) 15(-147.6,-494.1) 16(-127.9,-494.1) 17(-108.2,-494.1) 18(-88.6,-494.1) 19(-68.9,-494.1) 20(-49.2,-494.1) 21(-29.5,-494.1) 22(-9.8,-494.1) 23(9.9,-494.1) 24(29.6,-494.1) 25(49.2,-494.1) 26(68.9,-494.1) 27(88.6,-494.1) 28(108.3,-494.1) 29(128,-494.1) 30(147.7,-494.1) 31(167.3,-494.1) 32(187,-494.1) 33(206.7,-494.1) 34(226.4,-494.1) 35(246.1,-494.1) 36(265.8,-494.1) 37(285.5,-494.1) 38(305.1,-494.1) 39(324.8,-494.1) 40(344.5,-494.1) 41(364.2,-494.1) 42(383.9,-494.1) 43(403.6,-494.1) 44(423.3,-494.1) 89(423.3,494.1) 90(403.6,494.1) 91(383.9,494.1) 92(364.2,494.1) 93(344.5,494.1) 94(324.8,494.1) 95(305.1,494.1) 96(285.5,494.1) 97(265.8,494.1) 98(246.1,494.1) 99(226.4,494.1) 100(206.7,494.1) 101(187,494.1) 102(167.3,494.1) 103(147.7,494.1) 104(128,494.1) 105(108.3,494.1) 106(88.6,494.1) 107(68.9,494.1) 108(49.2,494.1) 109(29.6,494.1) 110(9.9,494.1) 111(-9.8,494.1) 112(-29.5,494.1) 113(-49.2,494.1) 114(-68.9,494.1) 115(-88.6,494.1) 116(-108.2,494.1) 117(-127.9,494.1) 118(-147.6,494.1) 119(-167.3,494.1) 120(-187,494.1) 121(-206.7,494.1) 122(-226.4,494.1) 123(-246,494.1) 124(-265.7,494.1) 125(-285.4,494.1) 126(-305.1,494.1) 127(-324.8,494.1) 128(-344.5,494.1) 129(-364.1,494.1) 130(-383.8,494.1) 131(-403.5,494.1) 132(-423.2,494.1)
  oval 70.9x11 smd: 45(494.1,-423.3) 46(494.1,-403.6) 47(494.1,-383.9) 48(494.1,-364.2) 49(494.1,-344.5) 50(494.1,-324.8) 51(494.1,-305.1) 52(494.1,-285.5) 53(494.1,-265.8) 54(494.1,-246.1) 55(494.1,-226.4) 56(494.1,-206.7) 57(494.1,-187) 58(494.1,-167.3) 59(494.1,-147.7) 60(494.1,-128) 61(494.1,-108.3) 62(494.1,-88.6) 63(494.1,-68.9) 64(494.1,-49.2) 65(494.1,-29.6) 66(494.1,-9.9) 67(494.1,9.8) 68(494.1,29.5) 69(494.1,49.2) 70(494.1,68.9) 71(494.1,88.6) 72(494.1,108.2) 73(494.1,127.9) 74(494.1,147.6) 75(494.1,167.3) 76(494.1,187) 77(494.1,206.7) 78(494.1,226.4) 79(494.1,246) 80(494.1,265.7) 81(494.1,285.4) 82(494.1,305.1) 83(494.1,324.8) 84(494.1,344.5) 85(494.1,364.1) 86(494.1,383.8) 87(494.1,403.5) 88(494.1,423.2) 133(-494.1,423.2) 134(-494.1,403.5) 135(-494.1,383.8) 136(-494.1,364.1) 137(-494.1,344.5) 138(-494.1,324.8) 139(-494.1,305.1) 140(-494.1,285.4) 141(-494.1,265.7) 142(-494.1,246) 143(-494.1,226.4) 144(-494.1,206.7) 145(-494.1,187) 146(-494.1,167.3) 147(-494.1,147.6) 148(-494.1,127.9) 149(-494.1,108.2) 150(-494.1,88.6) 151(-494.1,68.9) 152(-494.1,49.2) 153(-494.1,29.5) 154(-494.1,9.8) 155(-494.1,-9.9) 156(-494.1,-29.6) 157(-494.1,-49.2) 158(-494.1,-68.9) 159(-494.1,-88.6) 160(-494.1,-108.3) 161(-494.1,-128) 162(-494.1,-147.7) 163(-494.1,-167.3) 164(-494.1,-187) 165(-494.1,-206.7) 166(-494.1,-226.4) 167(-494.1,-246.1) 168(-494.1,-265.8) 169(-494.1,-285.5) 170(-494.1,-305.1) 171(-494.1,-324.8) 172(-494.1,-344.5) 173(-494.1,-364.2) 174(-494.1,-383.9) 175(-494.1,-403.6) 176(-494.1,-423.3)
  silkscreen extent -455,-513 443,443
OSC-SMD_4P-L3.2-W2.5-BL_SIT8008BI [mm]
  rect 1.4x1.2 smd: 1(-1.1,-0.95) 2(1.1,-0.95) 3(1.1,0.95) 4(-1.1,0.95)
  silkscreen extent -2.54,-2.29 2.1,1.7
PWRM-TH_B0505S-1WR3 [mm]
  rect 1.6x1.6 hole 1: 1(-3.81,0)
  round 1.6 hole 1: 2(-1.27,0) 3(1.27,0) 4(3.81,0)
  silkscreen extent -5.75,-0.7 5.75,5.3
QFN-32_L5.0-W5.0-P0.50-TL-EP3.7 [mm]
  rect 0.65x0.28 smd paste-100 mask+0.051: 1(-2.478,1.75) 2(-2.478,1.25) 3(-2.478,0.75) 4(-2.478,0.25) 5(-2.478,-0.25) 6(-2.478,-0.75) 7(-2.478,-1.25) 8(-2.478,-1.75) 17(2.478,-1.75) 18(2.478,-1.25) 19(2.478,-0.75) 20(2.478,-0.25) 21(2.478,0.25) 22(2.478,0.75) 23(2.478,1.25) 24(2.478,1.75)
  rect 0.28x0.65 smd paste-100 mask+0.051: 9(-1.75,-2.478) 10(-1.25,-2.478) 11(-0.75,-2.478) 12(-0.25,-2.478) 13(0.25,-2.478) 14(0.75,-2.478) 15(1.25,-2.478) 16(1.75,-2.478) 25(1.75,2.478) 26(1.25,2.478) 27(0.75,2.478) 28(0.25,2.478) 29(-0.25,2.478) 30(-0.75,2.478) 31(-1.25,2.478) 32(-1.75,2.478)
  rect 3.8x3.8 smd paste-100 mask+0.051: 33(0,0)
  silkscreen extent -3,-2.58 2.58,2.58
R0603 [mm]
  rect 0.806x0.864 smd paste-100 mask+0.051: 1(-0.753,0) 2(0.753,0)
  silkscreen extent -1.39,-0.66 1.39,0.66
RES-ARRAY-SMD_0603-8P-L3.2-W1.6-BL [mil]
  rect 25.6x31.5 smd: 1(-47.2,-31.5) 4(47.3,-31.5) 5(47.3,31.5) 8(-47.2,31.5)
  rect 19.7x31.5 smd: 2(-15.7,-31.5) 3(15.8,-31.5) 6(15.8,31.5) 7(-15.7,31.5)
  silkscreen extent -74,-57 74,58
RJ45-TH_HR911105A [mm]
  rect 1.6x1.6 hole 1: 1(-4.45,4.355)
  round 1.6 hole 1: 2(-3.18,6.895) 3(-1.91,4.355) 4(-0.64,6.895) 5(0.63,4.355) 6(1.9,6.895) 7(3.17,4.355) 8(4.44,6.895)
  round 1.8 hole 1.1: 9(-6.625,-6.895) 10(-4.085,-6.895) 11(4.085,-6.895) 12(6.625,-6.895)
  round 2.5 hole 1.8: SH1(-7.745,1.055) SH2(7.745,1.055)
  Keep-Out Layer board cut-out: 7.366,-1.995 7.366,-2.158 7.303,-2.477 7.178,-2.777 6.997,-3.047 6.767,-3.277 6.497,-3.458 6.197,-3.583 5.878,-3.646 5.552,-3.646 5.233,-3.583 4.933,-3.458 4.663,-3.277 4.433,-3.047 4.252,-2.777 4.127,-2.477 4.064,-2.158 4.064,-1.995 4.064,-1.832 4.127,-1.513 4.252,-1.213 4.433,-0.943 4.663,-0.713 4.933,-0.532 5.233,-0.407 5.552,-0.344 5.878,-0.344 6.197,-0.407 6.497,-0.532 6.767,-0.713 6.997,-0.943 7.178,-1.213 7.303,-1.513 7.366,-1.832 7.366,-1.995 7.365,-1.995
  Keep-Out Layer board cut-out: -4.064,-1.995 -4.064,-2.158 -4.127,-2.477 -4.252,-2.777 -4.433,-3.047 -4.663,-3.277 -4.933,-3.458 -5.233,-3.583 -5.552,-3.646 -5.878,-3.646 -6.197,-3.583 -6.497,-3.458 -6.767,-3.277 -6.997,-3.047 -7.178,-2.777 -7.303,-2.477 -7.366,-2.158 -7.366,-1.995 -7.366,-1.832 -7.303,-1.513 -7.178,-1.213 -6.997,-0.943 -6.767,-0.713 -6.497,-0.532 -6.197,-0.407 -5.878,-0.344 -5.552,-0.344 -5.233,-0.407 -4.933,-0.532 -4.663,-0.713 -4.433,-0.943 -4.252,-1.213 -4.127,-1.513 -4.064,-1.832 -4.064,-1.995 -4.065,-1.995
  Keep-Out Layer circle w0.003: c5.715,-1.995 r1.65
  Keep-Out Layer circle w0.003: c-5.715,-1.995 r1.65
  Keep-Out Layer region: 7.365,-1.995 7.355,-2.173 7.326,-2.35 7.279,-2.522 7.213,-2.688 7.129,-2.846 7.029,-2.994 6.913,-3.13 6.783,-3.253 6.641,-3.361 6.488,-3.453 6.326,-3.528 6.156,-3.585 5.982,-3.623 5.804,-3.643 5.626,-3.643 5.448,-3.623 5.274,-3.585 5.104,-3.528 4.942,-3.453 4.789,-3.361 4.647,-3.253 4.517,-3.13 4.401,-2.994 4.301,-2.846 4.217,-2.688 4.151,-2.522 4.104,-2.35 4.075,-2.173 4.065,-1.995 4.075,-1.817 4.104,-1.64 4.151,-1.468 4.217,-1.302 4.301,-1.144 4.401,-0.997 4.517,-0.86 4.647,-0.737 4.789,-0.629 4.942,-0.537 5.104,-0.462 5.274,-0.405 5.448,-0.367 5.626,-0.347 5.804,-0.347 5.982,-0.367 6.156,-0.405 6.326,-0.462 6.488,-0.537 6.641,-0.629 6.783,-0.737 6.913,-0.86 7.029,-0.997 7.129,-1.144 7.213,-1.302 7.279,-1.468 7.326,-1.64 7.355,-1.817 7.365,-1.995
  Keep-Out Layer region: 7.366,-1.995 7.366,-2.158 7.303,-2.477 7.178,-2.777 6.997,-3.047 6.767,-3.277 6.497,-3.458 6.197,-3.583 5.878,-3.646 5.552,-3.646 5.233,-3.583 4.933,-3.458 4.663,-3.277 4.433,-3.047 4.252,-2.777 4.127,-2.477 4.064,-2.158 4.064,-1.995 4.064,-1.832 4.127,-1.513 4.252,-1.213 4.433,-0.943 4.663,-0.713 4.933,-0.532 5.233,-0.407 5.552,-0.344 5.878,-0.344 6.197,-0.407 6.497,-0.532 6.767,-0.713 6.997,-0.943 7.178,-1.213 7.303,-1.513 7.366,-1.832 7.366,-1.995 7.365,-1.995
  Keep-Out Layer region: -4.065,-1.995 -4.075,-2.173 -4.104,-2.35 -4.151,-2.522 -4.217,-2.688 -4.301,-2.846 -4.401,-2.994 -4.517,-3.13 -4.647,-3.253 -4.789,-3.361 -4.942,-3.453 -5.104,-3.528 -5.274,-3.585 -5.448,-3.623 -5.626,-3.643 -5.804,-3.643 -5.982,-3.623 -6.156,-3.585 -6.326,-3.528 -6.488,-3.453 -6.641,-3.361 -6.783,-3.253 -6.913,-3.13 -7.029,-2.994 -7.129,-2.846 -7.213,-2.688 -7.279,-2.522 -7.326,-2.35 -7.355,-2.173 -7.365,-1.995 -7.355,-1.817 -7.326,-1.64 -7.279,-1.468 -7.213,-1.302 -7.129,-1.144 -7.029,-0.997 -6.913,-0.86 -6.783,-0.737 -6.641,-0.629 -6.488,-0.537 -6.326,-0.462 -6.156,-0.405 -5.982,-0.367 -5.804,-0.347 -5.626,-0.347 -5.448,-0.367 -5.274,-0.405 -5.104,-0.462 -4.942,-0.537 -4.789,-0.629 -4.647,-0.737 -4.517,-0.86 -4.401,-0.997 -4.301,-1.144 -4.217,-1.302 -4.151,-1.468 -4.104,-1.64 -4.075,-1.817 -4.065,-1.995
  Keep-Out Layer region: -4.064,-1.995 -4.064,-2.158 -4.127,-2.477 -4.252,-2.777 -4.433,-3.047 -4.663,-3.277 -4.933,-3.458 -5.233,-3.583 -5.552,-3.646 -5.878,-3.646 -6.197,-3.583 -6.497,-3.458 -6.767,-3.277 -6.997,-3.047 -7.178,-2.777 -7.303,-2.477 -7.366,-2.158 -7.366,-1.995 -7.366,-1.832 -7.303,-1.513 -7.178,-1.213 -6.997,-0.943 -6.767,-0.713 -6.497,-0.532 -6.197,-0.407 -5.878,-0.344 -5.552,-0.344 -5.233,-0.407 -4.933,-0.532 -4.663,-0.713 -4.433,-0.943 -4.252,-1.213 -4.127,-1.513 -4.064,-1.832 -4.064,-1.995 -4.065,-1.995
  silkscreen extent -8.05,-12.92 8.05,8.68
SC-70-5_L2.1-W1.3-P0.65-LS2.1-BR [mm]
  rect 0.899x0.399 smd: 1(1.1,-0.65) 2(1.1,0) 3(1.1,0.65) 4(-1.1,0.65) 5(-1.1,-0.65)
  silkscreen extent -0.7,-1.4 1.27,1.15
SMA_L4.3-W2.6-LS5.0-FD [mm]
  rect 1.801x1.621 smd: 1(-2.151,-0.008) 2(2.149,0.01)
  silkscreen extent -2.17,-1.32 2.18,1.29
SMB_L4.6-W3.6-LS5.3-BI [mm]
  rect 2.047x2.4 smd: 1(-2.391,0) 2(2.391,0)
  silkscreen extent -2.67,-1.91 2.74,1.91
SOD-123_L2.7-W1.6-LS3.7-RD [mil] "BZT52C"
  rect 35.8x48 smd: 1(-64.4,0) 2(64.4,0)
  silkscreen extent -63,-40 54,39
SOD-323_L1.7-W1.3-LS2.6-RD-1 [mm]
  rect 0.83x0.63 smd paste+0 mask+0.05: 1(-1.14,0) 2(1.14,0)
  silkscreen extent -1.02,-0.64 0.89,0.64
SOIC-8_L4.9-W3.9-P1.27-LS6.0-BL [mm]
  oval 0.588x2.045 smd paste+0: 1(-1.905,-2.772) 2(-0.635,-2.772) 3(0.635,-2.772) 4(1.905,-2.772) 5(1.905,2.772) 6(0.635,2.772) 7(-0.635,2.772) 8(-1.905,2.772)
  silkscreen extent -2.8,-2.92 2.53,1.52
SOIC-8_L5.0-W4.0-P1.27-LS6.0-BL-EP2.0 [mm]
  oval 0.574x2.038 smd: 1(-1.905,-2.769) 2(-0.635,-2.769) 3(0.635,-2.769) 4(1.905,-2.769) 5(1.905,2.769) 6(0.635,2.769) 7(-0.635,2.769) 8(-1.905,2.769)
  rect 2x2 smd: 9(0,0)
  silkscreen extent -2.79,-2.92 2.53,1.52
SOIC-8_L5.3-W5.3-P1.27-LS8.0-BL [mm]
  oval 0.63x2.25 smd: 1(-1.905,-3.53) 2(-0.635,-3.53) 3(0.635,-3.53) 4(1.905,-3.53) 5(1.905,3.53) 6(0.635,3.53) 7(-0.635,3.53) 8(-1.905,3.53)
  silkscreen extent -2.82,-3.68 2.64,2.18
SOIC-14_L8.7-W3.9-P1.27-LS6.0-BL [mm]
  oval 0.574x2.037 smd: 1(-3.81,-2.619) 2(-2.54,-2.619) 3(-1.27,-2.619) 4(0,-2.619) 5(1.27,-2.619) 6(2.54,-2.619) 7(3.81,-2.619) 8(3.81,2.619) 9(2.54,2.619) 10(1.27,2.619) 11(0,2.619) 12(-1.27,2.619) 13(-2.54,2.619) 14(-3.81,2.619)
  silkscreen extent -4.7,-2.92 4.38,1.4
SOT765-1_L2.0-W2.3-P0.50-LS3.1-BL [mil]
  oval 11.8x39.4 smd: 1(-29.5,-57.1) 2(-9.9,-57.1) 3(9.8,-57.1) 4(29.5,-57.1) 5(29.5,57.1) 6(9.8,57.1) 7(-9.9,57.1) 8(-29.5,57.1)
  silkscreen extent -54,-59 39,35
SOT-23-3_L2.9-W1.6-P1.90-LS2.8-BR [mm] "DO4085A"
  rect 1.069x0.599 smd: 1(1.234,-0.95) 2(1.234,0.95) 3(-1.234,0)
  silkscreen extent -0.88,-1.54 0.88,1.54
SOT-23-3_L3.0-W1.7-P0.95-LS2.9-BR [mm]
  rect 1.037x0.532 smd: 1(1.101,-0.95) 2(1.101,0.95) 3(-1.101,0)
  silkscreen extent -0.86,-1.53 0.86,1.53
SOT-23-5_L3.0-W1.7-P0.95-LS2.8-BR [mm]
  rect 1.1x0.6 smd paste+0 mask+0.102: 1(1.3,-0.95) 2(1.3,0) 3(1.3,0.95) 4(-1.3,0.95) 5(-1.3,-0.95)
  silkscreen extent -0.9,-1.55 0.9,1.55
SW-SMD_L6.0-W3.3-LS8.0 [mm] "TS-1101-C-W"
  rect 1.9x1.5 smd: 1(-4,0) 2(4,0)
  silkscreen extent -3.14,-1.67 2.86,1.63
SW-TH_CTR_ED08905M-FE15C7.0-C10-2053 [mil]
  round 70.9 hole 47.2: 1(78.7,-108.3) 2(-78.8,-108.3)
  round 55.1 hole 31.5: A(78.7,-9.8) B(-78.8,-9.8) C(0,-9.8)
  round 60 hole 36: S1(-78.8,108.3) S2(78.7,108.3)
  silkscreen extent -152,-750 152,138
TF-SMD_TF-CARD-H1.8 [mil]
  rect 27.6x63 smd paste+0 mask+2: 1(88.6,198.8) 2(45.3,198.8) 3(2,198.8) 4(-41.3,198.8) 5(-84.6,198.8) 6(-127.9,198.8) 7(-171.2,198.8) 8(-214.5,198.8) 9(-257.8,198.8)
  rect 47.2x55.1 smd paste+0 mask+2: 10(-305,179.1)
  rect 47.2x86.6 smd paste+0 mask+2: 11(-305.1,-198.8) 12(305.2,-198.8)
  rect 63x55.1 smd paste+0 mask+2: 13(269.7,179.1)
  Keep-Out Layer board cut-out: -174.4,-214.6 -174.8,-218.4 -175.9,-222.1 -177.7,-225.5 -180.1,-228.5 -183.1,-231 -186.5,-232.8 -190.2,-233.9 -194.1,-234.3 -197.9,-233.9 -201.6,-232.8 -205,-231 -208,-228.5 -210.4,-225.5 -212.2,-222.1 -213.4,-218.4 -213.7,-214.6 -213.4,-210.7 -212.2,-207.1 -210.4,-203.6 -208,-200.7 -205,-198.2 -201.6,-196.4 -197.9,-195.3 -194.1,-194.9 -190.2,-195.3 -186.5,-196.4 -183.1,-198.2 -180.1,-200.7 -177.7,-203.6 -175.9,-207.1 -174.8,-210.7 -174.4,-214.6
  Keep-Out Layer board cut-out: 139.8,-214.6 139.4,-218.4 138.3,-222.1 136.5,-225.5 134,-228.5 131.1,-231 127.7,-232.8 124,-233.9 120.1,-234.3 116.3,-233.9 112.6,-232.8 109.2,-231 106.2,-228.5 103.8,-225.5 101.9,-222.1 100.8,-218.4 100.4,-214.6 100.8,-210.7 101.9,-207.1 103.8,-203.6 106.2,-200.7 109.2,-198.2 112.6,-196.4 116.3,-195.3 120.1,-194.9 124,-195.3 127.7,-196.4 131.1,-198.2 134,-200.7 136.5,-203.6 138.3,-207.1 139.4,-210.7 139.8,-214.6
  Keep-Out Layer region: -174.4,-214.6 -174.8,-218.4 -175.9,-222.1 -177.7,-225.5 -180.1,-228.5 -183.1,-231 -186.5,-232.8 -190.2,-233.9 -194.1,-234.3 -197.9,-233.9 -201.6,-232.8 -205,-231 -208,-228.5 -210.4,-225.5 -212.2,-222.1 -213.4,-218.4 -213.7,-214.6 -213.4,-210.7 -212.2,-207.1 -210.4,-203.6 -208,-200.7 -205,-198.2 -201.6,-196.4 -197.9,-195.3 -194.1,-194.9 -190.2,-195.3 -186.5,-196.4 -183.1,-198.2 -180.1,-200.7 -177.7,-203.6 -175.9,-207.1 -174.8,-210.7 -174.4,-214.6
  Keep-Out Layer region: -174.4,-214.6 -174.8,-218.4 -175.9,-222.1 -177.7,-225.5 -180.1,-228.5 -183.1,-231 -186.5,-232.8 -190.2,-233.9 -194.1,-234.3 -197.9,-233.9 -201.6,-232.8 -205,-231 -208,-228.5 -210.4,-225.5 -212.2,-222.1 -213.4,-218.4 -213.7,-214.6 -213.4,-210.7 -212.2,-207.1 -210.4,-203.6 -208,-200.7 -205,-198.2 -201.6,-196.4 -197.9,-195.3 -194.1,-194.9 -190.2,-195.3 -186.5,-196.4 -183.1,-198.2 -180.1,-200.7 -177.7,-203.6 -175.9,-207.1 -174.8,-210.7 -174.4,-214.6
  Keep-Out Layer region: 139.8,-214.6 139.4,-218.4 138.3,-222.1 136.5,-225.5 134,-228.5 131.1,-231 127.7,-232.8 124,-233.9 120.1,-234.3 116.3,-233.9 112.6,-232.8 109.2,-231 106.2,-228.5 103.8,-225.5 101.9,-222.1 100.8,-218.4 100.4,-214.6 100.8,-210.7 101.9,-207.1 103.8,-203.6 106.2,-200.7 109.2,-198.2 112.6,-196.4 116.3,-195.3 120.1,-194.9 124,-195.3 127.7,-196.4 131.1,-198.2 134,-200.7 136.5,-203.6 138.3,-207.1 139.4,-210.7 139.8,-214.6
  Keep-Out Layer region: 139.8,-214.6 139.4,-218.4 138.3,-222.1 136.5,-225.5 134,-228.5 131.1,-231 127.7,-232.8 124,-233.9 120.1,-234.3 116.3,-233.9 112.6,-232.8 109.2,-231 106.2,-228.5 103.8,-225.5 101.9,-222.1 100.8,-218.4 100.4,-214.6 100.8,-210.7 101.9,-207.1 103.8,-203.6 106.2,-200.7 109.2,-198.2 112.6,-196.4 116.3,-195.3 120.1,-194.9 124,-195.3 127.7,-196.4 131.1,-198.2 134,-200.7 136.5,-203.6 138.3,-207.1 139.4,-210.7 139.8,-214.6
  Keep-Out Layer lines w0.1: -213.7,-214.6 -213.4,-210.7 -212.2,-207.1 -210.4,-203.6 -208,-200.7 -205,-198.2 -201.6,-196.4 -197.9,-195.3 -194.1,-194.9 -190.2,-195.3 -186.5,-196.4 -183.1,-198.2 -180.1,-200.7 -177.7,-203.6 -175.9,-207.1 -174.8,-210.7 -174.4,-214.6 -174.8,-218.4 -175.9,-222.1 -177.7,-225.5 -180.1,-228.5 -183.1,-231 -186.5,-232.8 -190.2,-233.9 -194.1,-234.3 -197.9,-233.9 -201.6,-232.8 -205,-231 -208,-228.5 -210.4,-225.5 -212.2,-222.1 -213.4,-218.4 -213.7,-214.6 ; 100.4,-214.6 100.8,-210.7 101.9,-207.1 103.8,-203.6 106.2,-200.7 109.2,-198.2 112.6,-196.4 116.3,-195.3 120.1,-194.9 124,-195.3 127.7,-196.4 131.1,-198.2 134,-200.7 136.5,-203.6 138.3,-207.1 139.4,-210.7 139.8,-214.6 139.4,-218.4 138.3,-222.1 136.5,-225.5 134,-228.5 131.1,-231 127.7,-232.8 124,-233.9 120.1,-234.3 116.3,-233.9 112.6,-232.8 109.2,-231 106.2,-228.5 103.8,-225.5 101.9,-222.1 100.8,-218.4 100.4,-214.6
  silkscreen extent -320,-381 320,209
TO-252-2_L6.6-W6.1-P4.58-TL [mil]
  rect 118.1x63 smd: 1(-141.3,90) 3(-141.3,-90)
  rect 244.1x228.3 smd: 2(141.3,1)
  silkscreen extent -151,-134 179,161
TSOP-54_L22.2-W10.2-P0.80-LS11.8-BL [mil]
  oval 19.7x70.9 smd: 1(-409.5,-222.2) 2(-378,-222.2) 3(-346.5,-222.2) 4(-315,-222.2) 5(-283.5,-222.2) 6(-252,-222.2) 7(-220.5,-222.2) 8(-189,-222.2) 9(-157.5,-222.2) 10(-126,-222.2) 11(-94.5,-222.2) 12(-63,-222.2) 13(-31.5,-222.2) 14(0,-222.2) 15(31.5,-222.2) 16(63,-222.2) 17(94.5,-222.2) 18(126,-222.2) 19(157.5,-222.2) 20(189,-222.2) 21(220.5,-222.2) 22(252,-222.2) 23(283.5,-222.2) 24(314.9,-222.2) 25(346.4,-222.2) 26(377.9,-222.2) 27(409.4,-222.2) 28(409.4,222.1) 29(377.9,222.1) 30(346.4,222.1) 31(314.9,222.1) 32(283.5,222.1) 33(252,222.1) 34(220.5,222.1) 35(189,222.1) 36(157.5,222.1) 37(126,222.1) 38(94.5,222.1) 39(63,222.1) 40(31.5,222.1) 41(0,222.1) 42(-31.5,222.1) 43(-63,222.1) 44(-94.5,222.1) 45(-126,222.1) 46(-157.5,222.1) 47(-189,222.1) 48(-220.5,222.1) 49(-252,222.1) 50(-283.5,222.1) 51(-315,222.1) 52(-346.5,222.1) 53(-378,222.1) 54(-409.5,222.1)
  silkscreen extent -442,-228 440,183
USB-C-SMD_TYPEC-304-BCP16 [mm]
  oval 1x2.1 hole 0.6 slot 1.8 at 90 deg paste-2539.97 mask+0.05: 13(-4.32,1.633) 14(4.32,1.633)
  oval 1x1.6 hole 0.6 slot 1.2 at 90 deg paste-2539.97 mask+0.05: 15(-4.32,-2.547) 16(4.32,-2.547)
  rect 0.55x1.45 smd paste-100 mask+0.05: A1B12(-3.225,2.547) A4B9(-2.45,2.547) B1A12(3.22,2.547) B4A9(2.45,2.547)
  rect 0.3x1.45 smd paste-100 mask+0.05: A5(-1.25,2.547) A6(-0.25,2.547) A7(0.25,2.547) A8(1.25,2.547) B5(1.75,2.547) B6(0.75,2.547) B7(-0.75,2.547) B8(-1.75,2.547)
  Keep-Out Layer board cut-out: 3.33,1.102 3.33,1.033 3.277,0.904 3.178,0.806 3.05,0.752 2.91,0.752 2.782,0.806 2.683,0.904 2.63,1.033 2.63,1.102 2.63,1.172 2.683,1.301 2.782,1.399 2.91,1.452 3.05,1.453 3.178,1.399 3.277,1.301 3.33,1.172 3.33,1.102 3.33,1.102
  Keep-Out Layer board cut-out: -2.63,1.102 -2.63,1.033 -2.683,0.904 -2.782,0.806 -2.91,0.752 -3.05,0.752 -3.178,0.806 -3.277,0.904 -3.33,1.033 -3.33,1.102 -3.33,1.172 -3.277,1.301 -3.178,1.399 -3.05,1.452 -2.91,1.452 -2.782,1.399 -2.683,1.301 -2.63,1.172 -2.63,1.102 -2.63,1.102
  Keep-Out Layer circle w0.025: c2.98,1.102 r0.35
  Keep-Out Layer circle w0.025: c-2.98,1.102 r0.35
  Keep-Out Layer region: 3.33,1.102 3.33,1.033 3.277,0.904 3.178,0.806 3.05,0.752 2.91,0.752 2.782,0.806 2.683,0.904 2.63,1.033 2.63,1.102 2.63,1.172 2.683,1.301 2.782,1.399 2.91,1.452 3.05,1.453 3.178,1.399 3.277,1.301 3.33,1.172 3.33,1.102 3.33,1.102
  Keep-Out Layer region: -2.63,1.102 -2.63,1.033 -2.683,0.904 -2.782,0.806 -2.91,0.752 -3.05,0.752 -3.178,0.806 -3.277,0.904 -3.33,1.033 -3.33,1.102 -3.33,1.172 -3.277,1.301 -3.178,1.399 -3.05,1.452 -2.91,1.452 -2.782,1.399 -2.683,1.301 -2.63,1.172 -2.63,1.102 -2.63,1.102
  silkscreen extent -4.32,-5.08 4.32,3.05